# Altium PCB MiniPC.PcbDoc (part 11 of 24)
Units mm, origin at the board's own origin, x right, y up, seen from the top; angles counter-clockwise.
Board outline 175 x 155 mm, 16 copper layers (1_Top, 2_int1_(gnd), 3_int2_(power), 4_int3_(gnd), 5_int4_(sign), 6_int5_(power), 7_int6_(sign), 8_int7_(power), 9_int8_(gnd), 10_int9_(sign), 11_int10_(gnd), 12_int11_(sign), 13_int12_(gnd), 14_int13_(power), 15_int14_(gnd), 16_Bottom), stack 2.008 mm thick; 1046 components, 837 nets, 6010 pads, 4009 vias.
Unrouted connection lines stored in the file: 564.
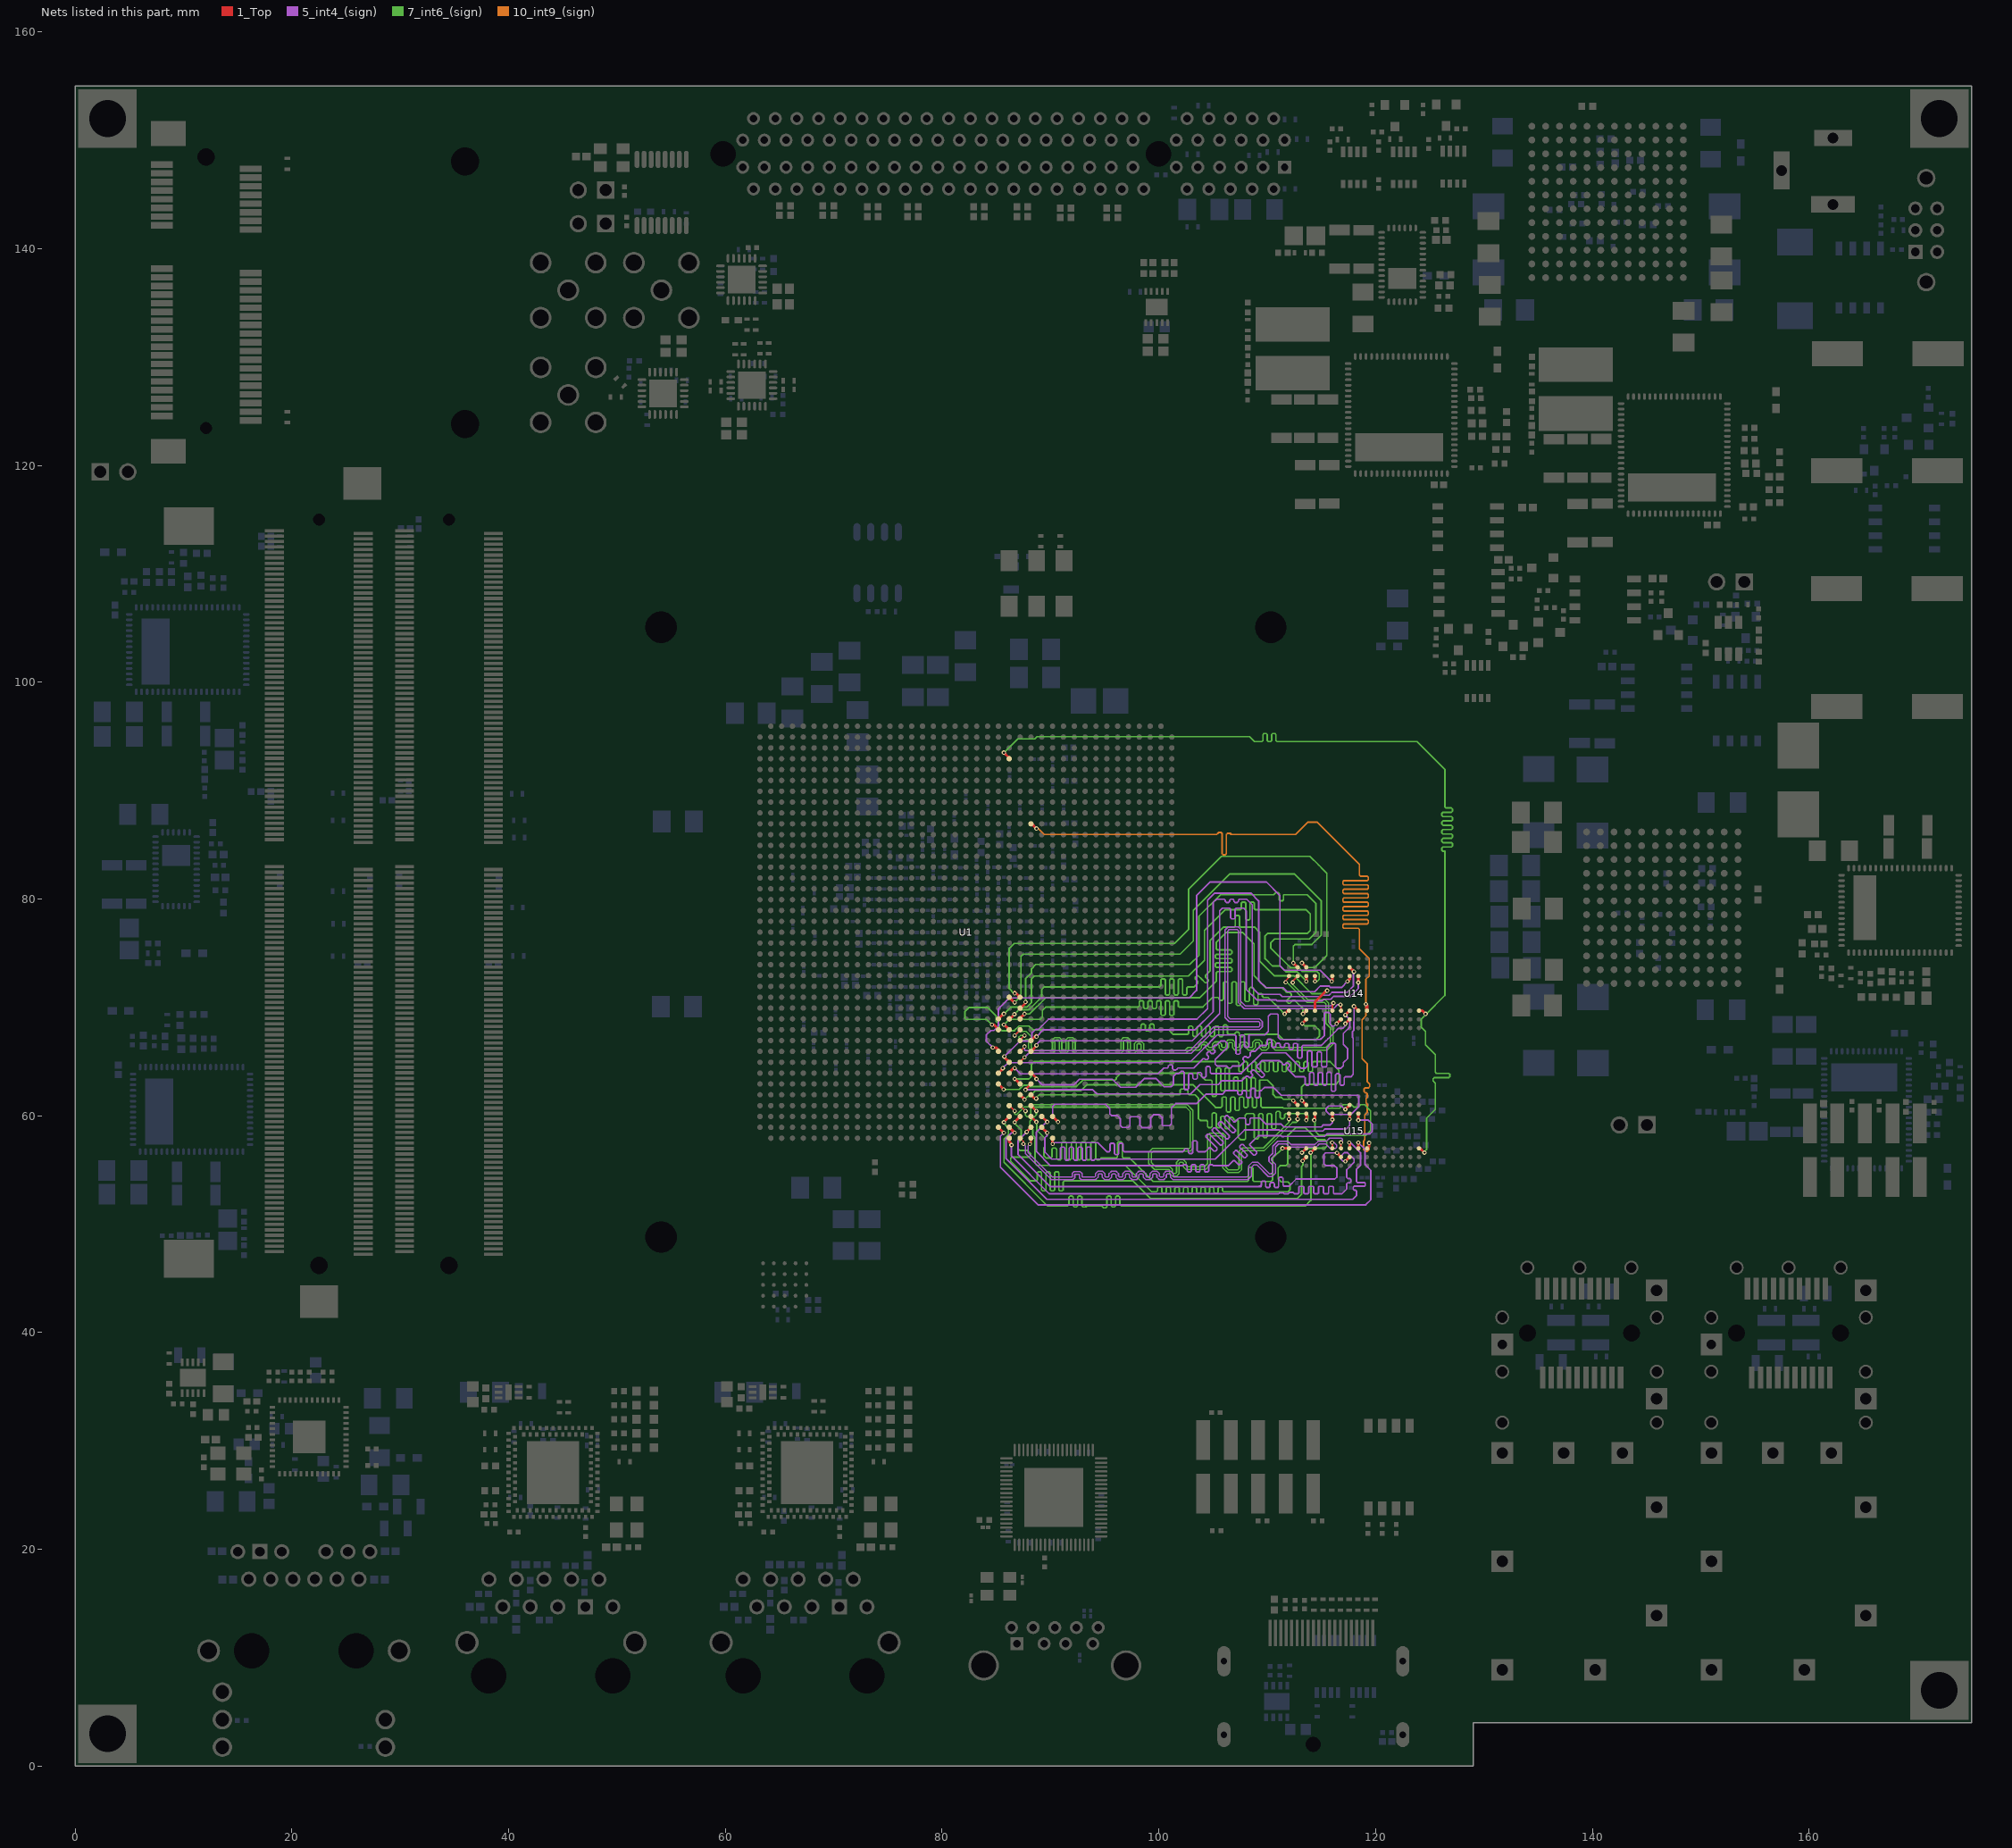
[diagram p23: the nets of this part, all layers, seen from the top]

## Via types
v1: diameter 0.4, hole 0.2, 1_Top to 16_Bottom, tented both sides, 1658 vias
v2: diameter 0.5, hole 0.2, 1_Top to 16_Bottom, tented both sides, 1014 vias
v3: diameter 0.7, hole 0.3, 1_Top to 16_Bottom, tented both sides, 915 vias
v4: diameter 0.6, hole 0.2, 1_Top to 16_Bottom, tented both sides, 278 vias
v5: diameter 0.4, hole 0.2, 1_Top to 16_Bottom, 93 vias
v6: diameter 0.4/0/0/0/0/0/0/0/0/0/0/0/0/0/0/0.4 (per signal layer), hole 0.2, 1_Top to 16_Bottom, tented both sides, 18 vias
v7: diameter 0.4/0/0/0/0/0/0/0/0/0/0/0.4/0.4/0.4/0.4/0.4 (per signal layer), hole 0.2, 1_Top to 16_Bottom, tented both sides, 16 vias
v8: diameter 0.5, hole 0.254, 1_Top to 16_Bottom, tented both sides, 15 vias
v9: diameter 0.5, hole 0.2, 1_Top to 16_Bottom, 2 vias

## Nets (pads, with @x,y where several pads share a name; then routed paths per layer and width w, separated by ;. In a path a pad name is that pad's centre, name@x,y a point inside that pad or via, vN(x,y) a via of type N, cw(c..) or ccw(c..) an arc to the next point about the centre after c; other vN are vias at no path point) (continued)
DDR4_DQ0: U1.AV26 U15.G2 | length 42.1
  1_Top w0.25: v1(87.8,58.5) 87.8,58.545 U1.AV26@88.194,58.939 ; v1(116.431,56.578) U15.G2@116.779,56.229 ; U15.G2@116.75,56.2 U15.G2@116.8,56.2
  5_int4_(sign) w0.15: v1(87.8,58.5) 87,57.7 87,56.45 89.99,53.46 109.41,53.46 ; 109.25,53.5 109.35,53.5 109.45,53.6 109.45,53.888 109.55,53.988 109.75,53.988 109.85,53.888 109.85,53.5 109.85,53.475 109.95,53.375 110.15,53.375 110.25,53.475 110.25,53.5 110.25,53.745 110.35,53.845 110.55,53.845 110.65,53.745 110.65,53.5 110.65,53.475 110.75,53.375 110.95,53.375 111.05,53.475 111.05,53.5 111.05,54.238 111.15,54.338 111.35,54.338 111.45,54.238 111.45,53.6 111.55,53.5 112,53.5 112.67,54.17 112.896,54.17 116.24,54.17 116.425,54.355 116.425,55.175 116.2,55.4 115.4,55.4 115.225,55.575 115.225,56.425 115.378,56.578 v1(116.431,56.578)
DDR4_DQ1: U1.AW28 U15.F7 | length 48
  1_Top w0.25: U1.AW28@90.194,57.939 90.194,57.406 v1(90.2,57.4) ; U15.F7@116,60.2 v1(116,59.65) ; v1(116,59.65) 116,59.6 v1(116,59.65)
  5_int4_(sign) w0.15: v1(90.2,57.4) 90.325,57.525 94.35,57.525 95.185,56.69 95.3,56.69 95.4,56.69 95.5,56.79 95.5,57.378 95.6,57.478 95.8,57.478 95.9,57.378 95.9,56.69 95.9,56.522 96,56.422 96.2,56.422 96.3,56.522 96.3,56.69 96.3,57.378 96.4,57.478 96.6,57.478 96.7,57.378 96.7,56.79 96.8,56.69 96.975,56.69 101.286,56.69 102.125,56.69 102.225,56.69 102.325,56.79 102.325,56.85 102.425,56.95 102.625,56.95 102.725,56.85 102.725,56.69 102.725,56.61 102.825,56.51 103.025,56.51 103.125,56.61 103.125,56.69 103.125,57.59 103.225,57.69 103.425,57.69 103.525,57.59 103.525,56.79 103.625,56.69 103.925,56.69 104.29,56.69 104.431,56.831 104.644,57.044 104.785,57.044 105.083,56.746 105.224,56.746 105.366,56.887 105.366,57.028 104.997,57.397 104.361,58.034 104.361,58.175 104.502,58.316 104.644,58.316 105.28,57.68 105.649,57.311 105.79,57.311 105.931,57.453 105.931,57.594 105.563,57.963 104.926,58.599 104.926,58.741 105.068,58.882 105.209,58.882 105.846,58.246 106.214,57.877 106.356,57.877 106.497,58.018 106.497,58.16 106.128,58.528 105.492,59.165 105.492,59.306 105.633,59.448 105.775,59.448 106.411,58.811 106.78,58.443 106.921,58.443 107.063,58.584 107.063,58.725 106.694,59.094 106.058,59.731 106.058,59.872 106.199,60.013 106.341,60.013 106.906,59.448 107.048,59.448 107.26,59.66 107.4,59.8 107.6,59.8 107.9,59.8 108,59.7 108,59.3 108.1,59.2 108.3,59.2 108.4,59.3 108.4,59.7 108.5,59.8 108.8,59.8 109.2,59.8 109.3,59.8 109.875,59.225 110.075,59.225 110.475,59.225 110.65,59.225 111.298,59.225 111.548,58.975 114.993,58.975 115.178,59.16 115.82,59.16 116,59.34 v1(116,59.65)
DDR4_DQ2: U1.AV24 U15.H3 | length 45.6
  1_Top w0.25: U1.AV24@86.194,58.939 v1(86.694,58.439) ; v1(117.55,57.525) 117.6,57.475 U15.H3@117.6,57
  5_int4_(sign) w0.15: v1(86.694,58.439) 86.409,58.439 85.89,57.92 85.89,56.081 89.671,52.3 116.45,52.3 116.625,52.3 116.975,52.3 117.325,52.3 117.675,52.3 117.9,52.3 118.225,52.625 118.225,52.8 118.225,53.063 118.138,53.15 118.011,53.15 117.924,53.238 117.924,53.413 118.011,53.5 118.225,53.5 118.953,53.5 119.04,53.588 119.04,53.763 118.953,53.85 118.313,53.85 118.225,53.938 118.225,54.2 118.225,54.336 118.225,54.976 118.225,55.051 118.6,55.426 118.6,56.601 118.352,56.849 118.352,56.852 117.679,57.525 v1(117.55,57.525)
DDR4_DQ3: U1.AV27 U15.H7 | length 42.1
  1_Top w0.25: U1.AV27@89.194,58.939 v1(89.694,58.439) ; v1(117.6,59.7) U15.H7@117.6,60.2
  5_int4_(sign) w0.15: v1(89.694,58.439) 89.694,58.194 89.475,57.975 89.475,56.646 90.121,56 90.725,56 90.825,56 90.925,56.1 90.925,57.013 91.025,57.113 91.225,57.113 91.325,57.013 91.325,56 91.415,55.91 91.635,55.91 91.725,56 91.725,57.013 91.825,57.113 92.025,57.113 92.125,57.013 92.125,56 92.215,55.91 92.435,55.91 92.525,56 92.525,57.013 92.625,57.113 92.825,57.113 92.925,57.013 92.925,56 93.015,55.91 93.235,55.91 93.325,56 93.325,57.013 93.425,57.113 93.625,57.113 93.725,57.013 93.725,56 93.815,55.91 94.035,55.91 94.125,56 95.75,56 105.2,56 107.89,58.69 109.461,58.69 111.111,58.69 111.192,58.61 111.39,58.61 111.395,58.605 115.146,58.605 115.331,58.79 117.29,58.79 117.6,59.1 v1(117.6,59.7)
DDR4_DQ4: U1.AW24 U15.H2 | length 45.9
  1_Top w0.25: U1.AW24@86.194,57.939 86.194,57.606 86.45,57.35 86.5,57.3 v1(86.4,57.3) ; v1(117.203,55.803) U15.H2@117.6,56.2
  5_int4_(sign) w0.15: v1(86.4,57.3) 86.4,56.292 89.882,52.81 109.93,52.81 110.159,52.81 110.617,52.81 111.05,52.81 111.075,52.835 111.144,52.903 111.464,52.903 111.533,52.835 111.558,52.81 111.922,52.81 111.991,52.879 112.06,52.947 112.38,52.947 112.449,52.879 112.518,52.81 112.838,52.81 112.907,52.879 112.907,53.424 112.976,53.493 113.296,53.493 113.365,53.424 113.365,52.879 113.434,52.81 113.754,52.81 113.823,52.879 113.823,53.424 113.892,53.493 114.212,53.493 114.281,53.424 114.281,52.879 114.35,52.81 114.67,52.81 114.739,52.879 114.739,53.424 114.808,53.493 115.128,53.493 115.197,53.424 115.197,52.879 115.266,52.81 115.586,52.81 115.655,52.879 115.655,53.424 115.724,53.493 116.044,53.493 116.113,53.424 116.113,52.879 116.182,52.81 116.885,52.81 117.325,53.25 117.325,53.425 117.325,53.725 117.425,53.825 117.615,53.825 117.715,53.925 117.715,54.125 117.615,54.225 117.425,54.225 117.325,54.325 117.325,54.425 117.325,55.025 118.01,55.71 118.01,55.99 117.825,56.175 ; v1(117.203,55.803) 116.998,55.803 116.801,56 116.801,56.301 117.1,56.6 117.399,56.6 117.824,56.175
DDR4_DQ5: U1.AU28 U15.H8 | length 48.7
  1_Top w0.25: U1.AU28@90.194,59.939 v1(90.694,59.439) ; v1(117.2,60.6) U15.H8@117.6,61
  5_int4_(sign) w0.15: v1(90.694,59.439) 90.2,59.933 90.2,60.875 90.4,61.075 95.05,61.075 95.475,60.65 95.475,60.175 95.625,60.025 96.15,60.025 96.45,59.725 96.45,59.1 96.625,58.925 97.175,58.925 97.325,59.075 97.325,59.825 97.425,59.925 98.15,59.925 98.25,59.825 98.25,59.125 98.475,58.9 99.15,58.9 99.25,59 99.25,59.85 99.5,60.1 100.05,60.1 100.3,59.85 100.3,59.175 100.375,59.1 100.975,59.1 101.15,59.275 101.15,60.725 101.55,61.125 103.475,61.125 104.34,61.99 105.85,61.99 106.2,62.34 106.68,62.34 106.88,62.34 107.18,62.34 107.28,62.24 107.28,62.043 107.38,61.943 107.58,61.943 107.68,62.043 107.68,62.24 107.78,62.34 107.98,62.34 108.08,62.24 108.08,61.761 108.18,61.661 108.38,61.661 108.48,61.761 108.48,62.34 108.48,62.439 108.58,62.539 108.78,62.539 108.88,62.439 108.88,62.34 108.88,61.761 108.98,61.661 109.18,61.661 109.28,61.761 109.28,62.24 109.38,62.34 109.46,62.34 109.73,62.61 110.589,62.61 111.299,61.9 115.547,61.9 116.253,61.9 118.35,61.9 118.45,61.8 118.45,60.851 117.724,60.125 115.75,60.125 115.425,60.45 115.425,60.675 115.65,60.9 116.85,60.9 117.15,60.6 v1(117.2,60.6)
DDR4_DQ6: U1.AV23 U15.J3 | length 46.1
  1_Top w0.25: U1.AV23@85.194,58.939 v1(85.694,58.439) ; U15.J3@118.4,57 v1(118.4,57.525)
  5_int4_(sign) w0.15: v1(85.694,58.439) 85.38,58.125 85.38,55.26 88.85,51.79 119.09,51.79 119.55,52.25 119.55,53.974 119.55,54.975 119.025,55.5 119.025,56.9 v1(118.4,57.525)
DDR4_DQ7: U1.AU27 U15.J7 | length 49.2
  1_Top w0.25: U1.AU27@89.194,59.939 v1(89.694,59.439) ; v1(118.4,59.6) U15.J7@118.4,60.2
  5_int4_(sign) w0.15: v1(89.694,59.439) 89.639,59.439 88.7,58.5 88.7,56.7 90,55.4 91.836,55.4 91.85,55.414 91.864,55.4 92.736,55.4 92.75,55.414 92.764,55.4 93.636,55.4 93.65,55.414 93.664,55.4 94.536,55.4 94.55,55.414 94.564,55.4 95.436,55.4 95.45,55.414 95.464,55.4 96.336,55.4 96.35,55.414 96.364,55.4 97.236,55.4 97.25,55.414 97.264,55.4 98.136,55.4 98.15,55.414 98.164,55.4 99.036,55.4 99.05,55.414 99.064,55.4 99.936,55.4 99.95,55.414 99.964,55.4 100.836,55.4 100.864,55.4 101.736,55.4 102,55.4 102.19,55.4 102.2,55.41 102.28,55.49 102.52,55.49 102.6,55.41 102.6,55.4 102.6,54.92 102.68,54.84 102.92,54.84 103,54.92 103,55.4 103,55.41 103.08,55.49 103.32,55.49 103.4,55.41 103.4,55.4 103.4,54.92 103.48,54.84 103.72,54.84 103.8,54.92 103.8,55.4 103.8,55.41 103.88,55.49 104.12,55.49 104.2,55.41 104.2,55.4 104.2,54.92 104.28,54.84 104.52,54.84 104.6,54.92 104.6,55.4 104.6,55.41 104.68,55.49 104.92,55.49 105,55.41 105.01,55.4 105.1,55.4 106.4,55.4 106.5,55.5 106.641,55.641 106.868,55.868 106.981,55.868 107.354,55.495 107.467,55.495 107.637,55.665 107.637,55.778 107.207,56.207 106.896,56.518 106.896,56.631 107.066,56.801 107.179,56.801 107.49,56.49 107.858,56.122 107.971,56.122 108.141,56.292 108.141,56.405 107.773,56.773 107.462,57.084 107.462,57.197 107.632,57.366 107.745,57.366 108.056,57.056 108.739,56.372 108.852,56.372 109.022,56.542 109.022,56.655 108.395,57.282 108.395,57.395 108.5,57.5 109.167,58.167 111.294,58.167 111.366,58.095 111.512,58.095 111.517,58.1 115.277,58.1 115.517,58.34 119.465,58.34 119.675,58.55 119.675,59.25 119.325,59.6 v1(118.4,59.6)
DDR4_DQ8: U1.AU26 U15.A3 | length 49.4
  1_Top w0.25: U1.AU26@88.194,59.939 v1(88.694,59.439) ; v1(111.4,57) U15.A3@112,57
  7_int6_(sign) w0.15: v1(88.694,59.439) 88.735,59.399 88.735,58.665 89.475,57.925 89.475,57.145 89.4,57.07 89.4,56.3 89.6,56.1 89.9,56.1 90.012,56.1 90.125,56.212 90.125,56.914 90.237,57.027 90.462,57.027 90.575,56.914 90.575,56.1 90.575,56.052 90.687,55.94 90.912,55.94 91.025,56.052 91.025,56.1 91.025,57.487 91.137,57.6 91.362,57.6 91.475,57.487 91.475,56.1 91.475,56.052 91.587,55.94 91.812,55.94 91.925,56.052 91.925,56.1 91.925,57.487 92.037,57.6 92.262,57.6 92.375,57.487 92.375,56.1 92.375,56.052 92.487,55.94 92.712,55.94 92.825,56.052 92.825,56.1 92.825,57.487 92.937,57.6 93.162,57.6 93.275,57.487 93.275,56.1 93.275,56.052 93.387,55.94 93.612,55.94 93.725,56.052 93.725,56.1 93.725,57.487 93.837,57.6 94.062,57.6 94.175,57.487 94.175,56.1 94.175,56.052 94.287,55.94 94.512,55.94 94.625,56.052 94.673,56.1 95.075,56.1 95.5,56.1 95.725,56.1 96.062,56.1 96.175,56.212 96.175,57.487 96.287,57.6 96.512,57.6 96.625,57.487 96.625,56.212 96.737,56.1 97.075,56.1 97.3,56.1 97.459,55.941 97.7,55.7 99.45,53.95 102.526,53.95 103.174,53.95 103.426,53.95 106.774,53.95 108.075,53.95 108.175,53.95 108.275,54.05 108.275,55.166 108.375,55.266 108.575,55.266 108.675,55.166 108.675,54.05 108.775,53.95 108.85,53.95 110.35,53.95 110.475,54.075 110.475,56.075 v1(111.4,57)
DDR4_DQ9: U1.AP23 U15.B8 | length 47.7
  1_Top w0.25: U1.AP23@85.194,62.939 85.675,62.458 v1(85.675,62.425) ; v1(112.4,61.4) U15.B8@112.8,61
  7_int6_(sign) w0.15: v1(85.675,62.425) 87.124,62.425 87.524,62.825 87.876,62.825 88.002,62.699 92.399,62.699 93,63.3 95.95,63.3 96.075,63.425 96.075,63.525 96.475,63.925 103.65,63.925 104.275,63.3 104.3,63.3 104.5,63.3 104.8,63.3 104.9,63.2 104.9,61.889 105,61.789 105.2,61.789 105.3,61.889 105.3,63.3 105.3,64.322 105.4,64.422 105.6,64.422 105.7,64.322 105.7,63.3 105.7,62.41 105.8,62.31 106,62.31 106.1,62.41 106.1,63.3 106.1,64.322 106.2,64.422 106.4,64.422 106.5,64.322 106.5,63.3 106.5,62.41 106.6,62.31 106.8,62.31 106.9,62.41 106.9,63.3 106.9,63.475 107,63.575 107.2,63.575 107.3,63.475 107.3,63.3 107.3,62.41 107.4,62.31 107.6,62.31 107.7,62.41 107.7,63.3 107.7,63.41 107.8,63.51 108,63.51 108.1,63.41 108.1,63.3 108.1,62.41 108.2,62.31 108.4,62.31 108.5,62.41 108.5,63.3 108.5,63.41 108.6,63.51 108.8,63.51 108.9,63.41 108.9,63.3 108.9,62.41 109,62.31 109.2,62.31 109.3,62.41 109.3,63.275 109.325,63.3 110,63.3 110.54,62.76 110.54,61.96 110.8,61.7 111.301,61.7 111.476,61.525 112.275,61.525 v1(112.4,61.4)
DDR4_DQ10: U1.AT26 U15.C3 | length 52
  1_Top w0.25: U1.AT26@88.194,60.939 v1(88.694,60.439) ; v1(113.2,56.6) U15.C3@113.6,57
  7_int6_(sign) w0.15: v1(88.694,60.439) 88.694,60.094 88.1,59.5 88.1,59 88.365,58.735 88.365,58.235 88.57,58.03 88.57,55.63 88.77,55.43 96.891,55.43 99.321,53 99.675,53 99.775,53 99.875,53.1 99.875,53.332 99.975,53.432 100.175,53.432 100.275,53.332 100.275,53 100.275,52.968 100.375,52.868 100.575,52.868 100.675,52.968 100.675,53 100.675,53.332 100.775,53.432 100.975,53.432 101.075,53.332 101.075,53 101.075,52.968 101.175,52.868 101.375,52.868 101.475,52.968 101.475,53 101.475,53.332 101.575,53.432 101.775,53.432 101.875,53.332 101.875,53 101.875,52.968 101.975,52.868 102.175,52.868 102.275,52.968 102.275,53 102.275,53.332 102.375,53.432 102.575,53.432 102.675,53.332 102.675,53 102.675,52.968 102.775,52.868 102.975,52.868 103.075,52.968 103.075,53 103.075,53.332 103.175,53.432 103.375,53.432 103.475,53.332 103.475,53 103.475,52.968 103.575,52.868 103.775,52.868 103.875,52.968 103.875,53 103.875,53.332 103.975,53.432 104.175,53.432 104.275,53.332 104.275,53 104.275,52.968 104.375,52.868 104.575,52.868 104.675,52.968 104.675,53 104.675,53.332 104.775,53.432 104.975,53.432 105.075,53.332 105.075,53 105.075,52.968 105.175,52.868 105.375,52.868 105.475,52.968 105.475,53 105.475,53.332 105.575,53.432 105.775,53.432 105.875,53.332 105.875,53.1 105.975,53 108.75,53 111.9,53 112.1,53.2 112.1,53.7 111.902,53.898 111.302,53.898 111,54.2 111,55.2 111.2,55.4 111.7,55.4 111.9,55.6 111.9,58.2 112.6,58.9 113.5,58.9 114.6,57.8 115.3,57.8 115.5,57.6 115.5,57.2 115.325,57.025 114.176,57.025 113.625,57.025 v1(113.2,56.6)
DDR4_DQ11: U1.AR26 U15.C7 | length 52.1
  1_Top w0.25: U1.AR26@88.194,61.939 88.539,61.594 v1(88.69,61.594) ; v1(113.6,59.6) U15.C7@113.6,60.2
  7_int6_(sign) w0.15: v1@88.69,61.679 88.941,61.93 101.9,61.93 101.95,61.98 101.95,62.35 102.075,62.475 102.525,62.475 102.675,62.325 102.675,62.05 102.795,61.93 103.349,61.93 103.64,61.639 103.64,59.76 103.825,59.575 103.9,59.575 104.1,59.575 104.4,59.575 104.5,59.475 104.5,59 104.6,58.9 104.8,58.9 104.9,59 104.9,59.575 104.9,60.166 105,60.266 105.2,60.266 105.3,60.166 105.3,59.575 105.3,59 105.4,58.9 105.6,58.9 105.7,59 105.7,59.575 105.7,59.86 105.8,59.96 106,59.96 106.1,59.86 106.1,59.575 106.1,58.9 106.2,58.8 106.4,58.8 106.5,58.9 106.5,59.575 106.5,59.749 106.6,59.849 106.8,59.849 106.9,59.749 106.9,59.675 107,59.575 107.25,59.575 107.325,59.5 107.325,58 107.525,57.8 107.9,57.8 108,57.9 108,59.679 107.949,59.73 107.949,60.04 108.104,60.196 ; 108.1,60.2 108.2,60.2 108.4,60.2 108.7,60.2 108.8,60.1 108.8,57.975 108.9,57.875 109.1,57.875 109.2,57.975 109.2,60.1 109.3,60.2 109.5,60.2 109.6,60.1 109.6,58.107 109.7,58.007 109.9,58.007 110,58.107 110,60.1 110.1,60.2 110.3,60.2 110.4,60.1 110.4,58.907 110.5,58.807 110.7,58.807 110.8,58.907 110.8,60.2 110.8,60.305 110.9,60.405 111.1,60.405 111.2,60.305 111.2,60.2 111.2,59.843 111.3,59.743 111.5,59.743 111.6,59.843 111.6,60.1 111.7,60.2 111.9,60.2 113.6,60.2 113.73,60.07 113.73,59.73 v1(113.6,59.6)
DDR4_DQ12: U1.AU25 U15.C2 | length 49.1
  1_Top w0.25: v1(86.7,59.4) 86.7,59.445 U1.AU25@87.194,59.939 ; v1(113.261,55.839) 113.261,55.861 U15.C2@113.6,56.2
  7_int6_(sign) w0.15: v1(86.7,59.4) 86.7,59.3 87.3,58.7 87.3,57.801 87,57.501 87,57 87.2,56.8 87.9,56.8 88.155,56.545 88.155,56.355 88,56.2 86.442,56.2 86.321,56.079 86.321,55.821 88.142,54 88.575,54 88.675,54 88.775,54.1 88.775,54.742 88.875,54.842 89.075,54.842 89.175,54.742 89.175,54 89.175,53.178 89.275,53.078 89.475,53.078 89.575,53.178 89.575,54 89.575,54.742 89.675,54.842 89.875,54.842 89.975,54.742 89.975,54 89.975,53.178 90.075,53.078 90.275,53.078 90.375,53.178 90.375,54 90.375,54.742 90.475,54.842 90.675,54.842 90.775,54.742 90.775,54 90.775,53.178 90.875,53.078 91.075,53.078 91.175,53.178 91.175,53.9 91.275,54 91.375,54 97.6,54 99.25,52.35 112.75,52.35 113.175,52.775 113.175,55.351 113.3,55.476 113.3,55.8 v1(113.261,55.839)
DDR4_DQ13: U1.AP25 U15.C8 | length 53.5
  1_Top w0.25: v1(86.7,63.4) 86.734,63.4 U1.AP25@87.194,62.939 ; v1(113.2,61.4) U15.C8@113.6,61
  5_int4_(sign) w0.15: v1@113.1,61.5 v1(113.2,61.4)
  7_int6_(sign) w0.15: v1(86.7,63.4) 88,63.4 88.25,63.65 88.25,64.775 88.475,65 90.55,65 90.555,64.995 90.885,64.995 90.89,65 91.47,65 91.475,64.995 91.785,64.995 91.79,65 106.775,65 106.975,65 107.275,65 107.375,64.9 107.375,64.173 107.475,64.073 107.675,64.073 107.775,64.173 107.775,64.9 107.875,65 108.075,65 108.175,64.9 108.175,64.173 108.275,64.073 108.475,64.073 108.575,64.173 108.575,64.9 108.675,65 108.875,65 108.975,64.9 108.975,64.173 109.075,64.073 109.275,64.073 109.375,64.173 109.375,64.9 109.475,65 109.675,65 109.775,64.9 109.775,64.173 109.875,64.073 110.075,64.073 110.175,64.173 110.175,64.9 110.275,65 110.475,65 110.575,64.9 110.575,64.173 110.675,64.073 110.875,64.073 110.975,64.173 110.975,64.9 111.075,65 111.275,65 111.375,64.9 111.375,64.173 111.475,64.073 111.675,64.073 111.775,64.173 111.775,64.9 111.875,65 112.075,65 112.175,64.9 112.175,64.173 112.275,64.073 112.475,64.073 112.575,64.173 112.575,64.9 112.675,65 112.875,65 112.975,64.9 112.975,64.173 113.075,64.073 113.275,64.073 113.375,64.173 113.375,64.9 113.475,65 113.675,65 113.775,64.9 113.775,64.173 113.875,64.073 114.075,64.073 114.175,64.173 114.175,64.9 114.275,65 114.575,65 114.7,65 115.8,65 116.6,64.2 116.6,63.2 116.3,62.9 113.4,62.9 113.175,62.675 113.175,61.425 v1(113.2,61.4)
DDR4_DQ14: U1.AU24 U15.D3 | length 47.1
  1_Top w0.25: v1(85.7,59.4) 85.7,59.445 U1.AU24@86.194,59.939 ; v1(114,56.6) U15.D3@114.4,57
  7_int6_(sign) w0.15: v1(85.7,59.4) 85.7,59.284 86.119,58.864 86.119,58.263 85.71,57.854 85.71,55.711 89.721,51.7 91.5,51.7 91.6,51.7 91.7,51.8 91.7,52.501 91.8,52.601 92,52.601 92.1,52.501 92.1,51.7 92.2,51.6 92.4,51.6 92.5,51.7 92.5,52.501 92.6,52.601 92.8,52.601 92.9,52.501 92.9,51.7 93,51.6 93.2,51.6 93.3,51.7 ; 93.3,51.61 93.39,51.7 93.7,51.7 94.1,51.7 94.2,51.7 94.4,51.7 94.71,51.7 94.8,51.61 94.9,51.51 95.1,51.51 95.2,51.61 95.2,51.7 95.2,52.501 95.3,52.601 95.5,52.601 95.6,52.501 95.6,51.7 95.7,51.6 95.9,51.6 96,51.7 96,52.501 96.1,52.601 96.3,52.601 96.4,52.501 96.4,51.8 96.5,51.7 96.9,51.7 113.525,51.7 114.025,52.2 114.025,56.575 v1(114,56.6) ; 93.3,51.62 93.3,51.69
DDR4_DQ15: U1.AR25 U15.D7 | length 53.4
  1_Top w0.25: U1.AR25@87.194,61.939 87.6,61.533 v1(87.6,61.5) ; v1(114.325,59.6) 114.3,59.6 114.312,59.612 114.4,59.7 U15.D7@114.4,60.2
  7_int6_(sign) w0.15: v1@87.6,61.524 87.624,61.524 87.89,61.79 88.08,61.79 88.59,62.3 92.8,62.3 93.375,62.875 103.125,62.875 105.225,60.775 105.625,60.775 105.725,60.775 105.825,60.875 105.825,61.632 105.925,61.732 106.125,61.732 106.225,61.632 106.225,60.775 106.225,60.453 106.325,60.353 106.525,60.353 106.625,60.453 106.625,60.775 106.625,61.632 106.725,61.732 106.925,61.732 107.025,61.632 107.025,60.775 107.025,60.589 107.125,60.489 107.325,60.489 107.425,60.589 107.425,60.775 107.425,61.632 107.525,61.732 107.725,61.732 107.825,61.632 107.825,60.875 107.925,60.775 108.125,60.775 108.225,60.875 108.225,61.632 108.325,61.732 108.525,61.732 108.625,61.632 108.625,60.875 108.725,60.775 108.925,60.775 109.025,60.875 109.025,61.632 109.125,61.732 109.325,61.732 109.425,61.632 109.425,60.875 109.525,60.775 109.825,60.775 109.85,60.775 111.426,60.775 111.501,60.7 116.699,60.7 117.024,61.025 117.774,61.025 117.999,60.8 118.399,60.8 118.624,61.025 118.976,61.025 119.53,60.471 119.53,58.63 119.1,58.2 114.8,58.2 114.4,58.6 114.4,59.6 v1(114.325,59.6)
DDR4_DQ16: U1.AN23 U14.G2 | length 46
  1_Top w0.25: U1.AN23@85.194,63.939 85.627,64.373 85.655,64.4 v1(85.6,64.4) ; v1(116.4,68.5) U14.G2@116.8,68.9
  5_int4_(sign) w0.15: v1(85.6,64.4) 86.1,64.9 100.064,64.9 100.189,65.025 101.644,65.025 ; 101.644,65.025 102.95,65.025 103.88,65.955 104.382,66.457 ; 104.382,66.457 104.477,66.552 104.917,66.992 105.381,67.456 106.5,67.456 106.7,67.456 107,67.456 107.1,67.356 107.1,65.783 107.2,65.683 107.4,65.683 107.5,65.783 107.5,67.356 107.6,67.456 107.8,67.456 107.9,67.356 107.9,66.412 108,66.312 108.2,66.312 108.3,66.412 108.3,67.456 109.756,67.456 110.1,67.8 110.1,69.2 110.295,69.395 110.905,69.395 111,69.3 111,67.25 111.2,67.05 114.95,67.05 114.95,67.1 115.275,67.425 115.275,69.45 115.35,69.525 115.675,69.525 115.8,69.4 115.8,68.45 115.975,68.275 116.175,68.275 v1(116.4,68.5)
DDR4_DQ17: U1.AL23 U14.F7 | length 54.2
  1_Top w0.25: v1(84.67,66.3) 84.979,66.3 85.339,65.939 U1.AL23@85.194,65.939 ; v1(115.95,72.4) 116,72.45 U14.F7@116,72.9
  5_int4_(sign) w0.15: v1(84.67,66.3) 84.07,66.9 84.07,67.44 84.5,67.87 84.78,67.87 85.19,68.28 85.19,69.86 86.205,70.875 102.795,70.875 103.48,71.56 103.48,80.319 104.731,81.57 109.91,81.57 111.17,80.31 111.17,73.85 111.59,73.43 114.869,73.43 115.899,72.4 v1(115.95,72.4)
DDR4_DQ18: U1.AN26 U14.H3 | length 54
  1_Top w0.25: U1.AN26@88.194,63.939 88.239,63.939 88.7,63.479 v1(88.7,63.4) ; v1(117.2,69.3) U14.H3@117.6,69.7
  5_int4_(sign) w0.15: v1(88.7,63.4) 89.225,62.875 92.162,62.875 92.662,63.375 95.7,63.375 96.445,62.63 97.855,62.63 98.675,63.45 99.7,63.45 100.475,62.675 101.1,62.675 101.35,62.925 101.35,63.65 101.6,63.9 101.74,63.9 101.84,63.9 101.94,64 102.04,64.1 102.24,64.1 102.34,64 102.34,63.9 102.34,62.506 102.44,62.406 102.64,62.406 102.74,62.506 102.74,63.8 102.84,63.9 103.04,63.9 103.14,63.8 103.14,63.482 103.24,63.382 103.44,63.382 103.54,63.482 103.54,63.9 103.64,64 103.84,64 103.94,63.9 103.94,63.631 104.04,63.531 104.24,63.531 104.34,63.631 104.34,63.9 104.34,64.448 104.44,64.548 104.64,64.548 104.74,64.448 104.74,64 104.84,63.9 106.2,63.9 107.6,63.9 109.51,65.81 111.69,65.81 113.1,64.4 113.489,64.4 113.5,64.4 113.71,64.61 113.71,65.9 113.8,65.99 114.01,65.99 114.1,65.9 114.1,64.6 114.2,64.5 114.5,64.5 114.6,64.6 114.6,65.8 114.7,65.9 114.9,65.9 115,65.8 115,64.6 115.1,64.5 115.4,64.5 115.5,64.6 115.5,66.279 115.921,66.7 116.2,66.7 116.3,66.6 116.3,64.5 116.4,64.4 116.8,64.4 117.025,64.625 117.025,64.905 117.415,65.295 117.415,66.185 117.025,66.575 117.025,67.6 117.625,68.2 117.625,68.875 v1(117.2,69.3)
DDR4_DQ19: U1.AM24 U14.H7 | length 53.9
  1_Top w0.25: v1(85.733,65.467) 85.733,65.4 U1.AM24@86.194,64.939 ; v1(117.4,72.4) 117.6,72.6 U14.H7@117.6,72.9
  5_int4_(sign) w0.15: v1(85.733,65.467) 85.767,65.467 87.2,66.9 88.04,66.9 88.275,67.135 88.275,67.615 88.63,67.97 88.87,67.97 89.82,68.92 103.52,68.92 104.5,69.9 104.5,79.896 105.154,80.55 108.475,80.55 109.2,79.825 109.2,72.5 109.88,71.82 111.441,71.82 111.811,71.45 114.37,71.45 114.895,71.975 115.696,71.975 115.831,71.84 116.84,71.84 v1(117.4,72.4)
DDR4_DQ20: U1.AN24 U14.H2 | length 46.3
  1_Top w0.25: U1.AN24@86.194,63.939 86.194,63.994 86.6,64.4 v1(86.7,64.4) ; v1(117.2,68.5) U14.H2@117.6,68.9
  5_int4_(sign) w0.15: v1(86.7,64.4) 87.225,63.875 99.925,63.875 100.46,64.41 100.67,64.41 100.77,64.41 100.87,64.51 100.87,64.6 100.97,64.7 101.17,64.7 101.27,64.6 101.27,64.41 101.27,64.324 101.37,64.224 101.57,64.224 101.67,64.324 ; 101.67,64.31 101.77,64.41 101.81,64.41 103.21,64.41 103.9,65.1 104.074,65.274 104.215,65.274 104.3,65.189 104.441,65.189 104.583,65.33 104.583,65.472 104.427,65.627 104.421,65.633 104.421,65.775 104.563,65.916 104.704,65.916 104.71,65.91 104.879,65.741 105.02,65.741 105.162,65.883 105.162,66.024 104.993,66.193 104.987,66.199 104.987,66.34 105.128,66.482 105.27,66.482 105.282,66.482 105.559,66.759 105.7,66.9 106.1,66.9 106.3,66.7 106.3,66.3 106.041,66.041 105.9,65.9 105.4,65.4 105.2,65.2 105.2,64.76 105.36,64.6 105.725,64.6 105.925,64.6 106.235,64.6 106.325,64.51 106.425,64.41 106.625,64.41 106.725,64.51 106.815,64.6 107.125,64.6 107.5,64.6 107.641,64.741 107.854,64.954 107.854,65.095 107.764,65.184 107.764,65.326 107.906,65.467 108.047,65.467 108.136,65.378 108.278,65.378 108.419,65.519 108.419,65.661 108.415,65.665 108.415,65.806 108.557,65.947 108.698,65.947 108.702,65.944 108.844,65.944 109.056,66.156 109.338,66.438 109.4,66.5 109.6,66.5 109.9,66.5 110,66.6 110,66.98 110.1,67.08 110.3,67.08 110.4,66.98 110.4,66.5 110.4,66.42 110.5,66.32 110.7,66.32 110.8,66.42 110.8,66.5 110.8,66.594 110.9,66.694 111.1,66.694 111.2,66.594 111.2,66.5 111.2,66.42 111.3,66.32 111.5,66.32 111.6,66.42 111.6,66.5 111.6,66.58 111.7,66.68 111.9,66.68 112,66.58 112,66.5 112,66.221 112.1,66.121 112.3,66.121 112.4,66.221 112.4,66.5 112.4,66.58 112.5,66.68 112.7,66.68 112.8,66.58 112.8,66.5 112.8,65.421 112.9,65.321 113.1,65.321 113.2,65.421 113.2,66.4 113.3,66.5 113.6,66.5 114,66.5 114.025,66.5 115,66.5 115.141,66.641 115.424,66.924 115.595,67.095 116.175,67.675 ; 101.67,64.311 101.67,64.323 ; 116.175,67.676 116.574,68.075 116.975,68.075 117.2,68.3 v1(117.2,68.5)
DDR4_DQ21: U1.AK26 U14.H8 | length 52.5
  1_Top w0.25: U1.AK26@88.194,66.939 88.7,67.445 v1(88.7,67.3) ; U14.H8@117.6,73.7 v1(118,73.3)
  5_int4_(sign) w0.15: v1(88.7,67.3) 89.34,67.94 103.34,67.94 105.01,69.61 105.01,78.389 ; 105.01,78.45 105.01,79.685 105.3,79.975 105.53,79.975 105.73,79.975 106.03,79.975 106.13,79.875 106.13,79.771 106.23,79.671 106.43,79.671 106.53,79.771 106.53,79.875 106.63,79.975 106.83,79.975 106.93,79.875 106.93,79.771 107.03,79.671 107.23,79.671 107.33,79.771 107.33,79.875 107.43,79.975 107.57,79.975 108.1,79.975 108.61,79.465 108.61,71.831 109.231,71.21 111.17,71.21 111.38,71 114.912,71 115.037,71.125 115.701,71.125 115.966,71.39 117.36,71.39 117.95,71.98 117.95,73.25 v1(118,73.3)
DDR4_DQ22: U1.AP26 U14.J3 | length 53.9
  1_Top w0.25: v1(87.7,62.4) 87.7,62.445 U1.AP26@88.194,62.939 ; v1(118,70.1) U14.J3@118.4,69.7
  5_int4_(sign) w0.15: v1(87.7,62.4) 93.9,62.4 94.275,62.025 102.935,62.025 103.8,62.89 105.477,62.89 105.827,63.24 107.661,63.24 107.723,63.302 107.865,63.443 108.077,63.655 108.218,63.655 108.339,63.534 108.481,63.534 108.622,63.676 108.622,63.817 108.501,63.938 108.501,64.08 108.642,64.221 108.784,64.221 109.441,63.564 109.583,63.564 109.724,63.705 109.724,63.846 109.067,64.504 109.067,64.645 109.173,64.752 109.521,65.1 111.1,65.1 111.4,64.8 111.471,64.729 111.612,64.729 111.76,64.877 111.902,64.877 112.043,64.736 112.043,64.594 111.895,64.446 111.895,64.305 111.9,64.3 112.6,63.6 112.9,63.6 113.1,63.6 113.4,63.6 113.5,63.5 113.5,62.925 113.6,62.825 113.8,62.825 113.9,62.925 113.9,63.6 113.9,63.89 114,63.99 114.2,63.99 114.3,63.89 114.3,63.6 114.3,62.925 114.4,62.825 114.6,62.825 114.7,62.925 114.7,63.6 114.7,63.9 114.8,64 115,64 115.1,63.9 115.1,63.6 115.1,62.925 115.2,62.825 115.4,62.825 115.5,62.925 115.5,63.6 115.5,63.931 115.6,64.031 115.8,64.031 115.9,63.931 115.9,63.6 115.9,62.37 116,62.27 116.2,62.27 116.3,62.37 116.3,63.6 116.3,63.79 116.4,63.89 116.6,63.89 116.7,63.79 116.7,63.6 116.7,62.925 116.8,62.825 117,62.825 117.1,62.925 117.1,63.5 117.2,63.6 117.5,63.6 117.7,63.6 117.925,63.825 117.925,67.176 117.875,67.226 117.875,67.776 117.995,67.896 117.995,68.695 118,68.7 v1(118,70.1)
DDR4_DQ23: U1.AL26 U14.J7 | length 52.4
  1_Top w0.25: U1.AL26@88.194,65.939 88.7,66.445 v1(88.7,66.5) ; v1(118.4,72.3) U14.J7@118.4,72.9
  5_int4_(sign) w0.15: v1(88.7,66.5) 88.7,66.583 89.042,66.925 103.075,66.925 105.6,69.45 105.6,78.9 105.85,79.15 106.025,79.15 106.225,79.15 106.525,79.15 106.625,79.05 106.625,78.269 106.725,78.169 106.925,78.169 107.025,78.269 107.025,79.05 107.125,79.15 107.15,79.15 107.825,79.15 108.059,78.916 108.059,71.661 109.02,70.7 110.8,70.7 110.9,70.6 115.036,70.6 115.19,70.755 115.854,70.755 116.119,71.02 117.68,71.02 118.4,71.74 v1(118.4,72.3)
DDR4_DQ24: U1.AJ24 U14.A3 | length 52.7
  1_Top w0.25: v1(85.7,68.4) 85.734,68.4 U1.AJ24@86.194,67.939 ; v1(111.6,69.4) 111.9,69.7 U14.A3@112,69.7
  7_int6_(sign) w0.15: v1(85.7,68.4) 86.195,68.895 89.06,68.895 89.25,69.085 89.25,69.71 89.57,70.03 97.99,70.03 98.09,70.03 98.19,70.13 98.19,70.521 98.29,70.621 98.49,70.621 98.59,70.521 98.59,70.03 98.59,69.994 98.69,69.894 98.89,69.894 98.99,69.994 98.99,70.03 98.99,70.521 99.09,70.621 99.29,70.621 99.39,70.521 99.39,70.03 99.39,69.994 99.49,69.894 99.69,69.894 99.79,69.994 99.79,70.03 99.79,70.521 99.89,70.621 100.09,70.621 100.19,70.521 100.19,70.03 100.19,69.369 100.29,69.269 100.49,69.269 100.59,69.369 100.59,70.03 100.59,70.521 100.69,70.621 100.89,70.621 100.99,70.521 100.99,70.03 100.99,69.369 101.09,69.269 101.29,69.269 101.39,69.369 101.39,70.03 101.39,70.521 101.49,70.621 101.69,70.621 101.79,70.521 101.79,70.11 101.87,70.03 104.05,70.03 104.944,70.924 105.144,70.924 105.444,70.924 105.544,70.824 105.544,70.758 105.644,70.658 105.844,70.658 105.944,70.758 105.944,70.924 105.944,72.261 106.044,72.361 106.244,72.361 106.344,72.261 106.344,70.924 106.344,70.48 106.444,70.38 106.644,70.38 106.744,70.48 106.744,70.924 106.744,72.261 106.844,72.361 107.044,72.361 107.144,72.261 107.144,70.924 107.144,70.28 107.244,70.18 107.444,70.18 107.544,70.28 107.544,70.924 107.544,72.261 107.644,72.361 107.844,72.361 107.944,72.261 107.944,70.924 107.944,70.648 108.044,70.548 108.244,70.548 108.344,70.648 108.344,70.924 108.344,71.735 108.444,71.835 108.644,71.835 108.744,71.735 108.744,70.924 108.744,70.326 108.844,70.226 109.044,70.226 109.144,70.326 109.144,70.924 109.144,71.19 109.244,71.29 109.444,71.29 109.544,71.19 109.544,71.024 109.644,70.924 109.67,70.924 110.076,70.924 111.167,69.833 111.554,69.446 111.6,69.446 v1(111.6,69.4)
DDR4_DQ25: U1.AF24 U14.B8 | length 47.1
  1_Top w0.25: U1.AF24@86.194,70.939 86.194,70.906 86.7,70.4 v1(86.7,70.45) ; v1(112.4,74.1) U14.B8@112.8,73.7
  7_int6_(sign) w0.15: v1(86.7,70.45) 87.276,71.026 87.276,74.696 87.49,74.91 101.96,74.91 103.18,76.13 103.18,78.955 106.545,82.32 112.481,82.32 114.99,79.811 114.99,76.69 114.1,75.8 112.552,75.8 112.4,75.648 v1(112.4,74.1)
DDR4_DQ26: U1.AH25 U14.C3 | length 47
  1_Top w0.25: U1.AH25@87.194,68.939 87.194,68.994 v1(87.6,69.4) ; v1@113.278,69.4 v1(113.3,69.4) ; v1(113.3,69.4) 113.3,69.422 113.578,69.7 U14.C3@113.6,69.7 v1(113.3,69.4)
  7_int6_(sign) w0.15: v1(87.6,69.4) 88.07,69.4 89.56,70.89 103.74,70.89 105.3,72.45 105.3,72.7 105.3,72.9 105.3,73.2 105.4,73.3 106.638,73.3 106.738,73.4 106.738,73.6 106.638,73.7 105.3,73.7 105.22,73.78 105.22,74.02 105.3,74.1 106.638,74.1 106.738,74.2 106.738,74.4 106.638,74.5 105.3,74.5 105.22,74.58 105.22,74.82 105.3,74.9 106.638,74.9 106.738,75 106.738,75.2 106.638,75.3 105.4,75.3 105.3,75.4 105.3,75.525 105.3,75.625 105.3,76.025 106.175,76.9 107.75,76.9 108.78,75.87 108.78,72.92 109.9,71.8 111.37,71.8 111.735,71.435 111.806,71.364 111.947,71.364 112.089,71.364 112.23,71.223 112.23,71.081 112.159,71.011 111.814,70.665 111.814,70.524 111.955,70.382 112.097,70.382 112.371,70.657 112.513,70.657 112.605,70.565 113.3,69.87 v1(113.3,69.4)
DDR4_DQ27: U1.AH23 U14.C7 | length 53.5
  1_Top w0.25: U1.AH23@85.194,68.939 85.655,69.4 v1(85.7,69.4) ; v1(113.6,72.4) U14.C7@113.6,72.9
  7_int6_(sign) w0.15: v1(85.7,69.4) 86.325,70.025 87.815,70.025 88.251,70.461 88.251,72.641 88.5,72.89 102.74,72.89 104.2,74.35 104.2,77.1 106.1,79 107.41,79 107.51,79 107.61,79.1 107.61,79.624 107.71,79.724 107.91,79.724 108.01,79.624 108.01,79 108.01,78.164 108.11,78.064 108.31,78.064 108.41,78.164 108.41,79 108.41,79.624 108.51,79.724 108.71,79.724 108.81,79.624 108.81,79.1 108.91,79 113.581,79 113.97,78.611 113.97,77.112 113.678,76.82 110.03,76.82 109.8,76.59 109.8,74.49 110.47,73.82 111.18,73.82 111.705,73.295 112.729,73.295 113.6,72.424 v1(113.6,72.4)
DDR4_DQ28: U1.AJ23 U14.C2 | length 52.9
  1_Top w0.25: v1@84.671,68.329 v1(84.6,68.4) 84.779,68.4 85.239,67.939 U1.AJ23@85.194,67.939 ; v1(113.233,68.511) 113.211,68.511 U14.C2@113.6,68.9
  7_int6_(sign) w0.15: v1(84.6,68.4) 84.1,68.9 82.2,68.9 82.1,69 82.1,69.6 82.5,70 84.2,70 85,69.2 85,68.7 85.275,68.425 85.275,68.075 85.496,67.854 86.664,67.854 87.09,68.28 87.999,68.28 88.349,67.93 98.15,67.93 98.25,67.93 98.35,68.03 98.35,68.361 98.45,68.461 98.65,68.461 98.75,68.361 98.75,67.93 98.827,67.853 99.073,67.853 99.15,67.93 99.15,68.361 99.25,68.461 99.45,68.461 99.55,68.361 99.55,68.03 99.65,67.93 100.07,67.93 100.91,67.93 101.33,67.51 102.631,67.51 102.731,67.61 102.731,68.176 102.831,68.276 103.031,68.276 103.131,68.176 103.131,67.51 103.131,67.414 103.231,67.314 103.431,67.314 103.531,67.414 103.531,67.51 103.531,68.176 103.631,68.276 103.831,68.276 103.931,68.176 103.931,67.51 103.931,67.414 104.031,67.314 104.231,67.314 104.331,67.414 104.331,67.51 104.331,68.176 104.431,68.276 104.631,68.276 104.731,68.176 104.731,67.51 104.731,67.414 104.831,67.314 105.031,67.314 105.131,67.414 105.131,67.51 105.131,68.176 105.231,68.276 105.431,68.276 105.531,68.176 105.531,67.51 105.531,67.414 105.631,67.314 105.831,67.314 105.931,67.414 105.931,67.51 105.931,68.271 106.031,68.371 106.231,68.371 106.331,68.271 106.331,67.61 106.431,67.51 106.6,67.51 106.825,67.51 106.925,67.51 107.025,67.61 107.025,67.612 107.125,67.712 107.325,67.712 107.425,67.612 107.425,67.51 107.425,67.41 107.525,67.31 107.725,67.31 107.825,67.41 107.925,67.51 108.225,67.51 108.4,67.51 110.99,67.51 111.5,67 114.451,67 114.825,67.374 114.825,67.726 114.82,67.731 114.82,67.879 114.399,68.299 113.445,68.299 v1(113.233,68.511)
DDR4_DQ29: U1.AF25 U14.C8 | length 52.2
  1_Top w0.25: v1(86.7,71.3) 86.7,71.433 U1.AF25@87.194,70.939 U1.AF25@87.061,70.939 ; v1(113.2,74.1) U14.C8@113.6,73.7
  7_int6_(sign) w0.15: v1(86.7,71.3) 86.63,71.3 86.19,71.74 86.19,75.45 86.64,75.9 101.43,75.9 102.75,77.22 102.75,80.925 105.765,83.94 113.93,83.94 114.73,83.14 115.14,82.73 115.5,82.37 115.5,74.8 114.375,73.675 113.648,73.675 113.223,74.1 v1(113.2,74.1) v1@113.1,74.1
DDR4_DQ30: U1.AH24 U14.D3 | length 53.4
  1_Top w0.25: U1.AH24@86.194,68.939 86.239,68.939 v1(86.67,69.37) ; U14.D3@114.4,69.7 114.4,70.5 115.45,71.55 v1(115.52,71.55)
  7_int6_(sign) w0.15: v1(86.67,69.37) 87.075,69.775 87.995,69.775 89.19,70.97 89.19,71.65 89.43,71.89 99.99,71.89 100.09,71.89 100.19,71.99 100.19,72.54 100.29,72.64 100.49,72.64 100.59,72.54 100.59,71.89 100.59,71.24 100.69,71.14 100.89,71.14 100.99,71.24 100.99,71.89 100.99,72.54 101.09,72.64 101.29,72.64 101.39,72.54 101.39,71.89 101.39,71.24 101.49,71.14 101.69,71.14 101.79,71.24 101.79,71.89 101.79,72.54 101.89,72.64 102.09,72.64 102.19,72.54 102.19,71.89 102.19,71.24 102.29,71.14 102.49,71.14 102.59,71.24 102.59,71.79 102.69,71.89 102.99,71.89 103.24,71.89 103.381,72.031 103.594,72.244 103.594,72.385 103.346,72.633 103.346,72.774 103.487,72.916 103.628,72.916 103.947,72.597 104.266,72.278 104.407,72.278 104.549,72.42 104.549,72.561 104.301,72.809 104.301,72.951 104.34,72.99 104.71,73.36 104.71,76.156 105.964,77.41 106.05,77.41 106.25,77.41 106.65,77.41 106.95,77.41 107.05,77.51 107.05,78.39 107.15,78.49 107.35,78.49 107.45,78.39 107.45,77.51 107.55,77.41 107.85,77.41 107.91,77.41 108.82,77.41 109.29,76.94 109.29,74.279 110.644,72.925 112.446,72.925 114.111,71.26 115.23,71.26 v1(115.52,71.55)
DDR4_DQ31: U1.AG25 U14.D7 | length 51.5
  1_Top w0.25: U1.AG25@87.194,69.939 87.239,69.939 87.7,70.4 v1(87.7,70.5) ; v1(114.4,72.4) U14.D7@114.4,72.9
  7_int6_(sign) w0.15: v1(87.7,70.5) 87.7,72.65 88.245,73.195 88.245,73.565 88.64,73.96 102.86,73.96 103.69,74.79 103.69,78.4 105.69,80.4 110.5,80.4 110.6,80.4 110.7,80.5 110.8,80.6 111,80.6 111.1,80.5 111.1,80.4 111.1,79.929 111.2,79.829 111.4,79.829 111.5,79.929 111.5,80.35 111.55,80.4 113.68,80.4 114.48,79.6 114.48,76.901 113.889,76.31 110.69,76.31 110.31,75.93 110.31,75.49 112.135,73.665 112.883,73.665 113.243,73.305 114.595,73.305 114.8,73.1 114.8,72.601 114.775,72.576 ; v1(114.4,72.4) 114.6,72.4 114.775,72.575
DDR4_DQS0_N: U1.AW25 U15.F3 | length 42.8
  1_Top w0.15: U1.AW25@87.194,57.939 87.5,57.633 v1(87.5,57.4) ; v1(115.975,57.525) 116,57.5 U15.F3@116,57
  5_int4_(sign) w0.13: v1(87.5,57.4) 87.68,57.22 87.68,56.521 87.977,56.224 88.081,56.12 90.101,54.1 92.063,54.1 92.235,54.272 92.235,54.58 92.266,54.612 92.642,54.612 92.673,54.58 92.673,54.272 92.845,54.1 94.157,54.1 94.385,54.328 94.385,54.573 94.472,54.66 94.688,54.66 94.775,54.573 94.775,54.328 95.003,54.1 95.417,54.1 95.645,54.328 95.645,54.573 95.732,54.66 95.948,54.66 96.035,54.573 96.035,54.328 96.263,54.1 96.677,54.1 96.905,54.328 96.905,54.573 96.992,54.66 97.208,54.66 97.295,54.573 97.295,54.328 97.523,54.1 97.937,54.1 98.165,54.328 98.165,54.573 98.252,54.66 98.468,54.66 98.555,54.573 98.555,54.328 98.783,54.1 99.197,54.1 99.425,54.328 99.425,54.573 99.512,54.66 99.728,54.66 99.815,54.573 99.815,54.328 100.043,54.1 100.457,54.1 100.685,54.328 100.685,54.573 100.772,54.66 100.988,54.66 101.075,54.573 101.075,54.328 101.303,54.1 108.199,54.1 108.54,54.441 108.54,55.24 108.76,55.46 109.04,55.46 110.1,54.4 110.45,54.4 110.74,54.69 110.74,55.56 110.4,55.9 110.4,56.1 110.75,56.45 110.75,57.111 111.054,57.415 111.785,57.415 112.1,57.1 114.484,57.1 114.784,57.4 115.4,57.4 115.8,57 116.3,57 116.4,57.1 116.4,57.3 116.175,57.525 v1(115.975,57.525)
DDR4_DQS0_P: U1.AW26 U15.G3 | length 42.5
  1_Top w0.15: v1(88.1,57.4) 88.194,57.494 U1.AW26@88.194,57.939 ; U15.G3@116.8,57 v1(116.8,57.537)
  5_int4_(sign) w0.13: v1(88.1,57.4) 87.92,57.22 87.92,56.62 87.977,56.563 88.321,56.219 90.2,54.34 91.964,54.34 91.995,54.371 91.995,54.68 92.167,54.852 92.741,54.852 92.913,54.68 92.913,54.371 92.944,54.34 94.058,54.34 94.145,54.427 94.145,54.672 94.373,54.9 94.787,54.9 95.015,54.672 95.015,54.427 95.102,54.34 95.318,54.34 95.405,54.427 95.405,54.672 95.633,54.9 96.047,54.9 96.275,54.672 96.275,54.427 96.362,54.34 96.578,54.34 96.665,54.427 96.665,54.672 96.893,54.9 97.307,54.9 97.535,54.672 97.535,54.427 97.622,54.34 97.838,54.34 97.925,54.427 97.925,54.672 98.153,54.9 98.567,54.9 98.795,54.672 98.795,54.427 98.882,54.34 99.098,54.34 99.185,54.427 99.185,54.672 99.413,54.9 99.827,54.9 100.055,54.672 100.055,54.427 100.142,54.34 100.358,54.34 100.445,54.427 100.445,54.672 100.673,54.9 101.087,54.9 101.315,54.672 101.315,54.427 101.402,54.34 108.1,54.34 108.3,54.54 108.3,55.4 108.6,55.7 109.139,55.7 110.199,54.64 110.351,54.64 110.5,54.789 110.5,55.461 110.16,55.801 110.16,56.199 110.5,56.539 110.5,57.2 110.955,57.655 111.884,57.655 112.199,57.34 114.385,57.34 114.685,57.64 115.439,57.64 115.749,57.95 116.84,57.95 116.94,57.85 116.94,57.677 v1(116.8,57.537)
DDR4_DQS1_N: U1.AT24 U15.A7 | length 50.7
  1_Top w0.15: U1.AT24@86.194,60.939 v1(86.694,60.439) ; v1(112,59.7) U15.A7@112,60.2
  7_int6_(sign) w0.13: v1(86.694,60.439) 86.694,60.186 86.77,60.11 86.86,60.11 87.575,60.825 88.036,60.825 88.255,61.044 102.595,61.044 103.14,60.499 103.14,56.99 102.91,56.76 99.509,56.76 99.3,56.551 99.3,55.7 99.7,55.3 101.012,55.3 101.24,55.072 101.24,54.777 101.327,54.69 101.543,54.69 101.63,54.777 101.63,55.726 101.858,55.954 102.272,55.954 102.5,55.726 102.5,55.387 102.587,55.3 104.2,55.3 104.5,55.6 104.5,58.2 104.7,58.4 105.9,58.4 106.14,58.16 106.14,55.3 106.44,55 107.261,55 107.4,55.139 107.4,56.739 107.701,57.04 109.64,57.04 112,59.4 v1(112,59.7)
DDR4_DQS1_P: U1.AT25 U15.B7 | length 51.1
  1_Top w0.15: U1.AT25@87.194,60.939 v1(87.694,60.439) ; v1(112.8,59.7) U15.B7@112.8,60.2
  7_int6_(sign) w0.13: v1(87.694,60.439) 87.694,60.056 87.817,59.933 88.063,59.933 88.19,60.06 88.19,60.64 88.354,60.804 102.496,60.804 102.9,60.4 102.9,57.089 102.811,57 99.41,57 99.06,56.65 99.06,55.601 99.601,55.06 100.913,55.06 101,54.973 101,54.678 101.228,54.45 101.642,54.45 101.87,54.678 101.87,55.627 101.957,55.714 102.173,55.714 102.26,55.627 102.26,55.288 102.488,55.06 104.299,55.06 104.74,55.501 104.74,58.04 104.86,58.16 105.74,58.16 105.9,58 105.9,55.201 106.341,54.76 107.36,54.76 107.64,55.04 107.64,56.64 107.8,56.8 109.739,56.8 112.339,59.4 112.7,59.4 112.8,59.5 v1(112.8,59.7) v1@112.639,59.7
DDR4_DQS2_N: U1.AL25 U14.F3 | length 53.3
  1_Top w0.15: U1.AL25@87.194,65.939 87.6,66.345 v1(87.6,66.4) ; U14.F3@116,69.7 116,70.3 v1(116.1,70.4)
  5_int4_(sign) w0.13: v1(87.6,66.4) 87.6,66.09 87.685,66.005 102.862,66.005 105.053,68.196 109.196,68.196 109.3,68.3 109.3,68.6 109.2,68.7 106.47,68.7 106.1,69.07 106.1,77.14 106.38,77.42 107.33,77.42 107.559,77.191 107.559,70.55 107.974,70.135 115.835,70.135 v1(116.1,70.4)
DDR4_DQS2_P: U1.AM25 U14.G3 | length 53.7
  1_Top w0.15: U1.AM25@87.194,64.939 87.194,64.994 v1(87.6,65.4) ; v1(116.75,70.25) 116.8,70.3 U14.G3@116.8,69.7
  5_int4_(sign) w0.13: v1(87.6,65.4) 87.965,65.765 102.983,65.765 104.175,66.957 105,67.782 105.174,67.956 109.295,67.956 109.54,68.201 109.54,68.699 109.299,68.94 106.57,68.94 106.34,69.17 106.34,77.041 106.479,77.18 107.231,77.18 107.319,77.091 107.319,70.451 107.875,69.895 116.125,69.895 116.48,70.25 v1(116.75,70.25)
DDR4_DQS3_N: U1.AJ25 U14.A7 | length 53.4
  1_Top w0.15: v1(86.7,67.4) 87.194,67.894 U1.AJ25@87.194,67.939 ; v1(111.69,72.32) 111.69,72.46 112,72.77 U14.A7@112,72.9
  7_int6_(sign) w0.13: v1(86.7,67.4) 87.07,67.77 87.77,67.77 88.23,67.31 88.23,66.31 88.535,66.005 90.095,66.005 90.18,66.09 90.18,67 90.405,67.225 90.815,67.225 91.04,67 91.04,66.09 91.125,66.005 91.335,66.005 91.42,66.09 91.42,67 91.645,67.225 92.055,67.225 92.28,67 92.28,66.09 92.365,66.005 96.405,66.005 96.49,66.09 96.49,66.98 96.715,67.206 97.125,67.206 97.35,66.98 97.35,66.09 97.435,66.005 97.645,66.005 97.73,66.09 97.73,66.66 97.955,66.885 98.365,66.885 98.59,66.66 98.59,66.09 98.675,66.005 100.901,66.005 102.38,66.005 102.678,66.303 103.605,66.303 103.69,66.387 103.69,66.589 103.915,66.814 104.325,66.814 104.55,66.589 104.55,66.387 104.635,66.303 104.845,66.303 104.93,66.387 104.93,66.593 105.155,66.819 105.565,66.819 105.79,66.593 105.79,66.387 105.875,66.303 106.085,66.303 106.17,66.387 106.17,66.784 106.395,67.01 106.805,67.01 107.03,66.784 107.03,66.387 107.115,66.303 107.325,66.303 107.41,66.387 107.41,66.585 107.635,66.81 108.045,66.81 108.27,66.585 108.27,66.387 108.355,66.303 108.565,66.303 108.65,66.387 108.65,66.784 108.875,67.01 109.285,67.01 109.51,66.784 109.51,66.387 109.595,66.303 109.805,66.303 109.89,66.387 109.89,66.784 110.115,67.01 110.525,67.01 110.75,66.784 110.75,66.387 110.835,66.303 115.413,66.303 115.83,66.719 115.83,68.11 115.41,68.53 115.41,70.311 115.241,70.48 113.648,70.48 111.808,72.32 v1(111.69,72.32)
DDR4_DQS3_P: U1.AK25 U14.B7 | length 53.5
  1_Top w0.15: U1.AK25@87.194,66.939 87.194,66.994 v1(87.6,67.4) ; v1(112.35,72.3) 112.35,72.45 U14.B7@112.8,72.9
  7_int6_(sign) w0.13: v1@87.6,67.5 v1(87.6,67.4) 87.22,67.4 87.07,67.25 87.07,67.13 87.17,67.03 87.355,67.03 87.445,66.94 87.635,66.94 87.725,67.03 87.91,67.03 87.99,66.95 87.99,66.211 88.436,65.765 90.195,65.765 90.42,65.99 90.42,66.9 90.505,66.985 90.715,66.985 90.8,66.9 90.8,65.99 91.025,65.765 91.435,65.765 91.66,65.99 91.66,66.9 91.745,66.985 91.955,66.985 92.04,66.9 92.04,65.99 92.265,65.765 96.505,65.765 96.73,65.99 96.73,66.881 96.815,66.966 97.025,66.966 97.11,66.881 97.11,65.99 97.335,65.765 97.745,65.765 97.97,65.99 97.97,66.56 98.055,66.645 98.265,66.645 98.35,66.56 98.35,65.99 98.575,65.765 100.801,65.765 102.479,65.765 102.777,66.063 103.705,66.063 103.93,66.288 103.93,66.49 104.015,66.574 104.225,66.574 104.31,66.49 104.31,66.288 104.535,66.063 104.945,66.063 105.17,66.288 105.17,66.494 105.255,66.579 105.465,66.579 105.55,66.494 105.55,66.288 105.775,66.063 106.185,66.063 106.41,66.288 106.41,66.685 106.495,66.77 106.705,66.77 106.79,66.685 106.79,66.288 107.015,66.063 107.425,66.063 107.65,66.288 107.65,66.485 107.735,66.57 107.945,66.57 108.03,66.485 108.03,66.288 108.255,66.063 108.665,66.063 108.89,66.288 108.89,66.685 108.975,66.77 109.185,66.77 109.27,66.685 109.27,66.288 109.495,66.063 109.905,66.063 110.13,66.288 110.13,66.685 110.215,66.77 110.425,66.77 110.51,66.685 110.51,66.288 110.735,66.063 115.513,66.063 116.07,66.62 116.07,68.209 115.65,68.63 115.65,70.41 115.34,70.72 113.747,70.72 112.35,72.117 v1(112.35,72.3)
DDR4_ODT: U1.K26 U14.K3 U15.K3 | length 94.1
  1_Top w0.25: U1.K26@88.194,86.939 88.261,86.939 v1(88.7,86.5) ; v1(119.1,70.3) 119.2,70.2 U14.K3@119.2,69.7 ; U15.K3@119.2,57 119.4,57.2 v1(119.4,57.5)
  10_int9_(sign) w0.15: v1(88.7,86.5) 88.875,86.5 89.425,85.95 105.225,85.95 105.325,85.95 105.425,86.05 105.525,86.15 105.725,86.15 105.825,86.05 105.825,85.95 105.825,84.177 105.925,84.077 106.125,84.077 106.225,84.177 106.225,85.95 106.325,86.05 106.525,86.05 106.625,85.95 106.625,86.05 106.725,85.95 107.75,85.95 112.6,85.95 113.725,87.075 114.625,87.075 118.5,83.2 118.5,82.9 118.5,82.2 118.6,82.1 119.228,82.1 119.328,82 119.328,81.8 119.228,81.7 118.5,81.7 117.072,81.7 116.972,81.6 116.972,81.4 117.072,81.3 118.5,81.3 119.228,81.3 119.328,81.2 119.328,81 119.228,80.9 118.5,80.9 117.072,80.9 116.972,80.8 116.972,80.6 117.072,80.5 118.5,80.5 119.228,80.5 119.328,80.4 119.328,80.2 119.228,80.1 118.5,80.1 117.072,80.1 116.972,80 116.972,79.8 117.072,79.7 118.5,79.7 119.228,79.7 119.328,79.6 119.328,79.4 119.228,79.3 118.5,79.3 117.072,79.3 116.972,79.2 116.972,79 117.072,78.9 118.5,78.9 119.228,78.9 119.328,78.8 119.328,78.6 119.228,78.5 118.5,78.5 117.072,78.5 116.972,78.4 116.972,78.2 117.072,78.1 118.5,78.1 119.228,78.1 119.328,78 119.328,77.8 119.228,77.7 118.5,77.7 117.072,77.7 116.972,77.6 116.972,77.4 117.072,77.3 118.4,77.3 118.5,77.2 118.5,77.1 118.5,75.399 119.4,74.499 119.4,72.9 119.1,72.6 v1(119.1,70.3) 119.1,69.224 118.744,68.868 118.744,65.256 119.225,64.775 119.225,63.26 119.225,63.148 119.338,63.035 119.341,63.035 119.454,62.923 119.454,62.698 119.341,62.585 119.225,62.585 119.037,62.585 118.925,62.473 118.925,62.248 119.037,62.135 119.113,62.135 119.225,62.023 119.225,61.9 119.225,61.726 119.114,61.615 119.114,61.185 119.225,61.074 119.225,60.32 119,60.095 119,57.8 118.9,57.7 118.9,56.9 119.08,56.72 119.22,56.72 119.4,56.9 v1(119.4,57.5)
DDR4_PAR: U1.D24 U14.T3 U15.T3 | length 95.8
  1_Top w0.25: v1(85.7,93.5) 86.106,93.094 86.194,93.094 U1.D24@86.194,92.939 ; U15.T3@124,57 124.1,57 v1(124.5,56.6) ; U14.T3@124,69.7 124.304,69.7 v1(124.604,69.4)
  7_int6_(sign) w0.15: v1(85.7,93.5) 86.975,94.775 88.55,94.775 88.75,94.975 108.37,94.975 108.825,94.52 109.4,94.52 109.5,94.52 109.6,94.62 109.6,95.16 109.7,95.26 109.9,95.26 110,95.16 110,94.62 110.1,94.52 110.3,94.52 110.4,94.62 110.4,95.16 110.5,95.26 110.7,95.26 110.8,95.16 110.8,94.62 110.9,94.52 111.95,94.52 123.83,94.52 126.38,91.97 126.38,88.6 126.38,88.5 126.48,88.4 126.99,88.4 127.09,88.3 127.09,88.1 126.99,88 126.38,88 126.21,88 126.11,87.9 126.11,87.7 126.21,87.6 126.38,87.6 126.99,87.6 127.09,87.5 127.09,87.3 126.99,87.2 126.38,87.2 126.21,87.2 126.11,87.1 126.11,86.9 126.21,86.8 126.38,86.8 126.99,86.8 127.09,86.7 127.09,86.5 126.99,86.4 126.38,86.4 126.21,86.4 126.11,86.3 126.11,86.1 126.21,86 126.38,86 126.99,86 127.09,85.9 127.09,85.7 126.99,85.6 126.38,85.6 126.21,85.6 126.11,85.5 126.11,85.3 126.21,85.2 126.38,85.2 126.99,85.2 127.09,85.1 127.09,84.9 126.99,84.8 126.38,84.8 126.21,84.8 126.11,84.7 126.11,84.5 126.21,84.4 126.38,84.4 126.38,71.101 124.679,69.4 v1(124.604,69.4) 124.604,69.304 124.2,68.9 124.2,68.199 124.6,67.799 124.6,66.546 125.5,65.646 125.5,65.1 125.5,64.02 125.6,63.92 126.751,63.92 126.851,63.82 126.851,63.62 126.751,63.52 125.5,63.52 125.4,63.52 125.3,63.42 125.3,63.22 125.4,63.12 125.5,63.02 125.5,62.92 125.5,60.599 124.7,59.799 124.7,56.9 124.5,56.7 v1(124.5,56.6)